# Altium PCB TYH-PD67W 2C1A 主板.pcbdoc (part 1 of 2)
Units mm, origin at the board's own origin, x right, y up, seen from the top; angles counter-clockwise.
Board outline 94.32 x 66.89 mm, 5 copper layers (Top Layer, Signal Layer 3, Signal Layer 1, Signal Layer 2, Bottom Layer), stack 0.941 mm thick; 52 components, 153 nets, 152 pads, 297 vias.
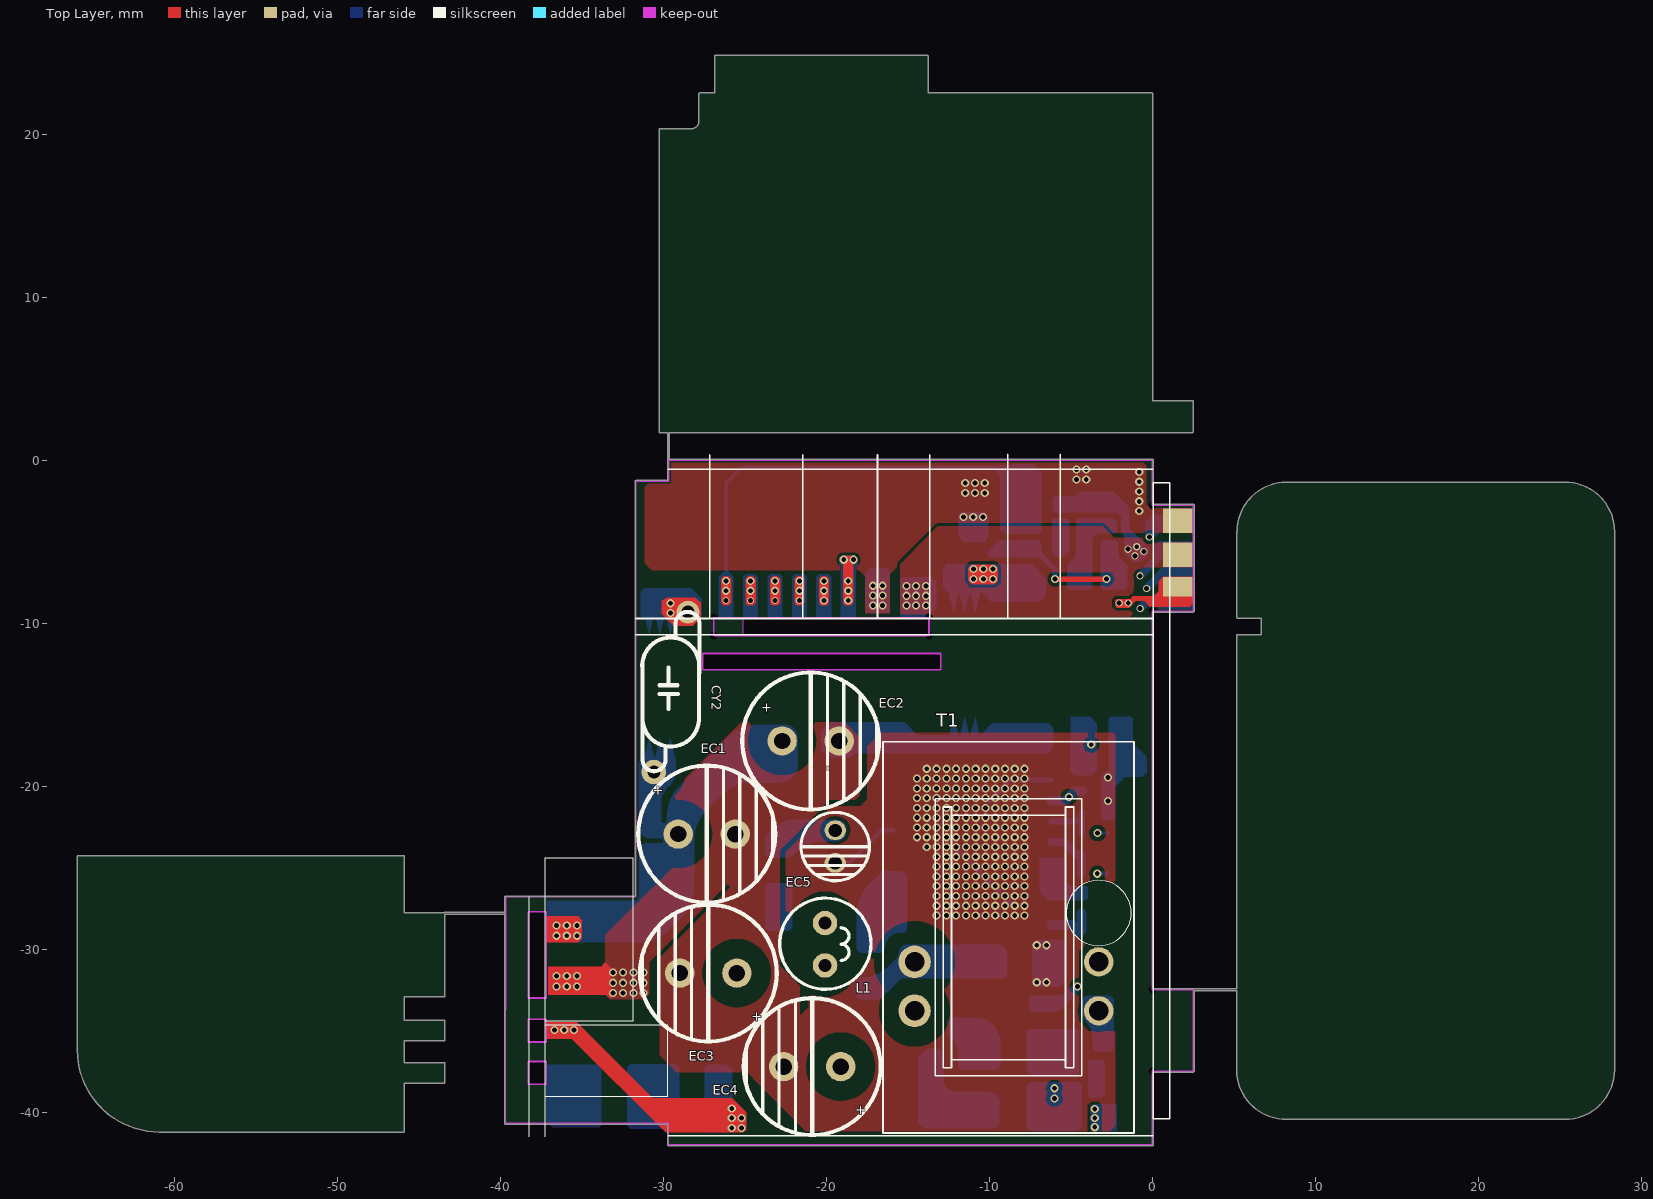
[diagram p0: Top Layer view]
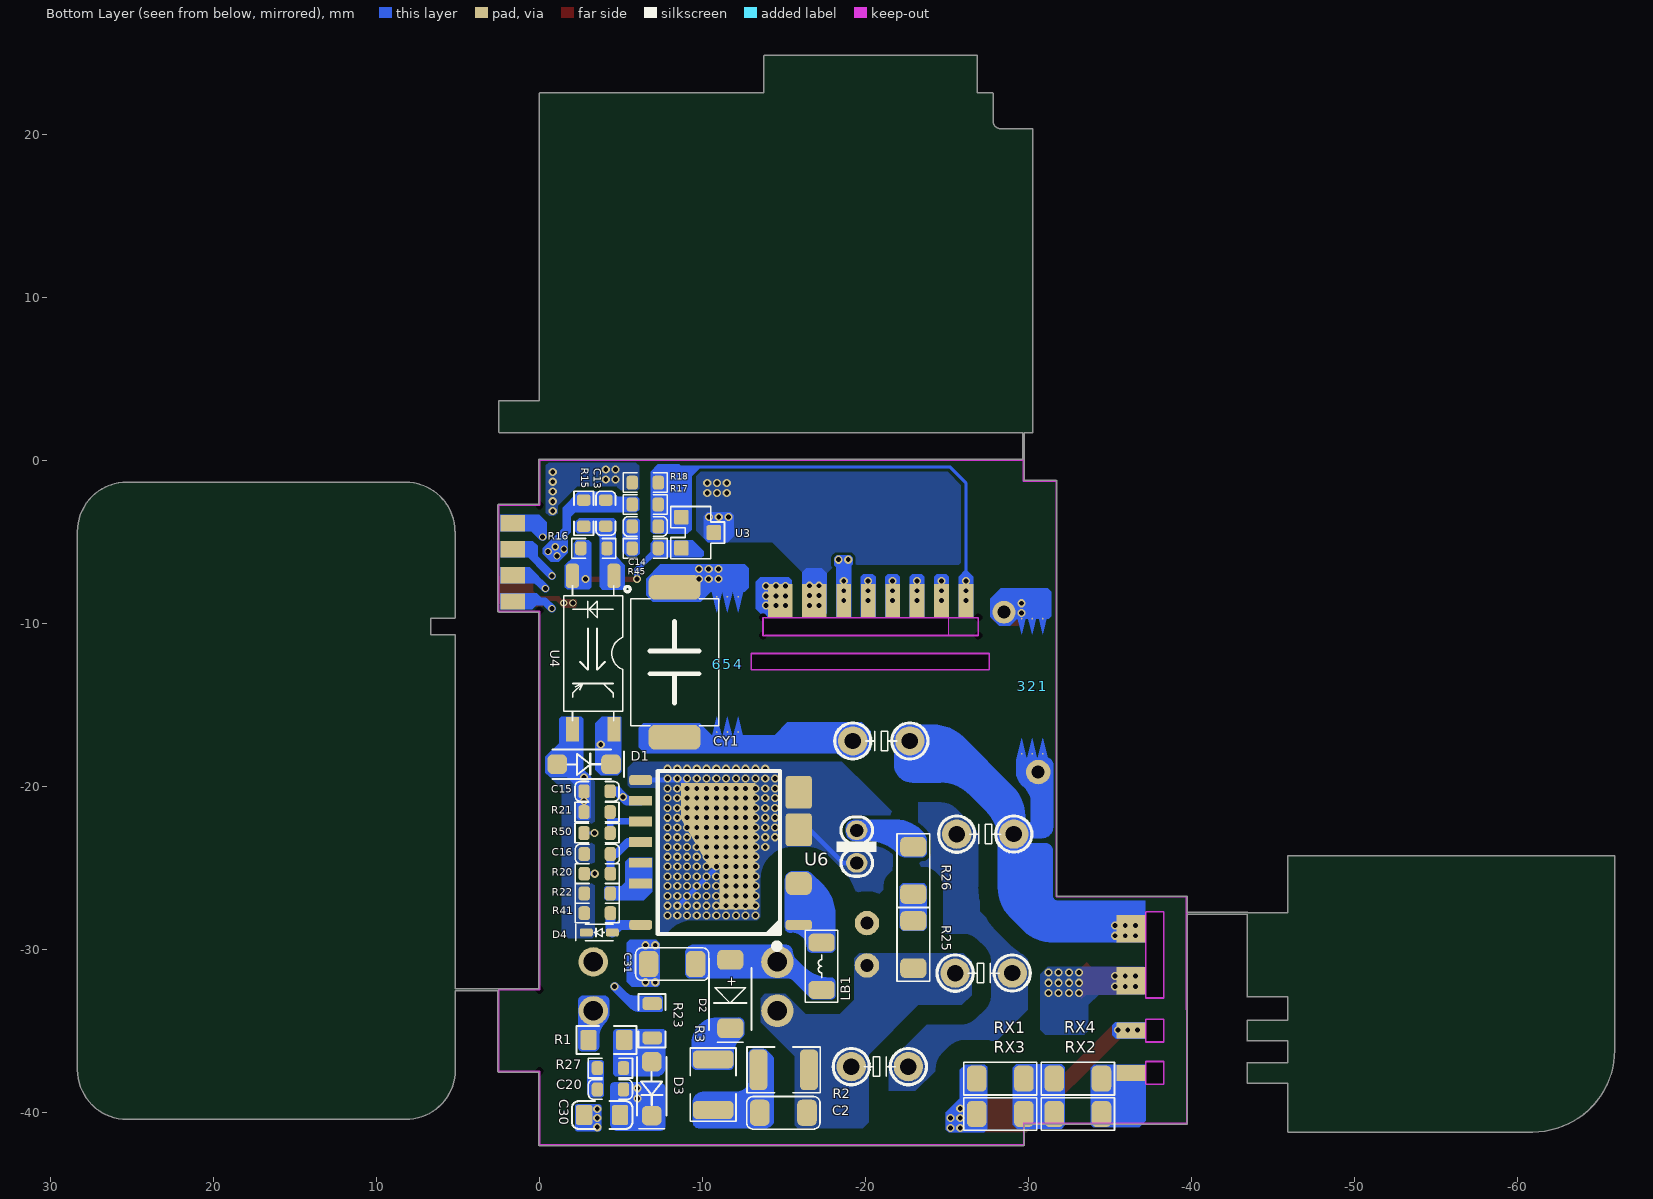
[diagram p1: Bottom Layer view, seen from below]
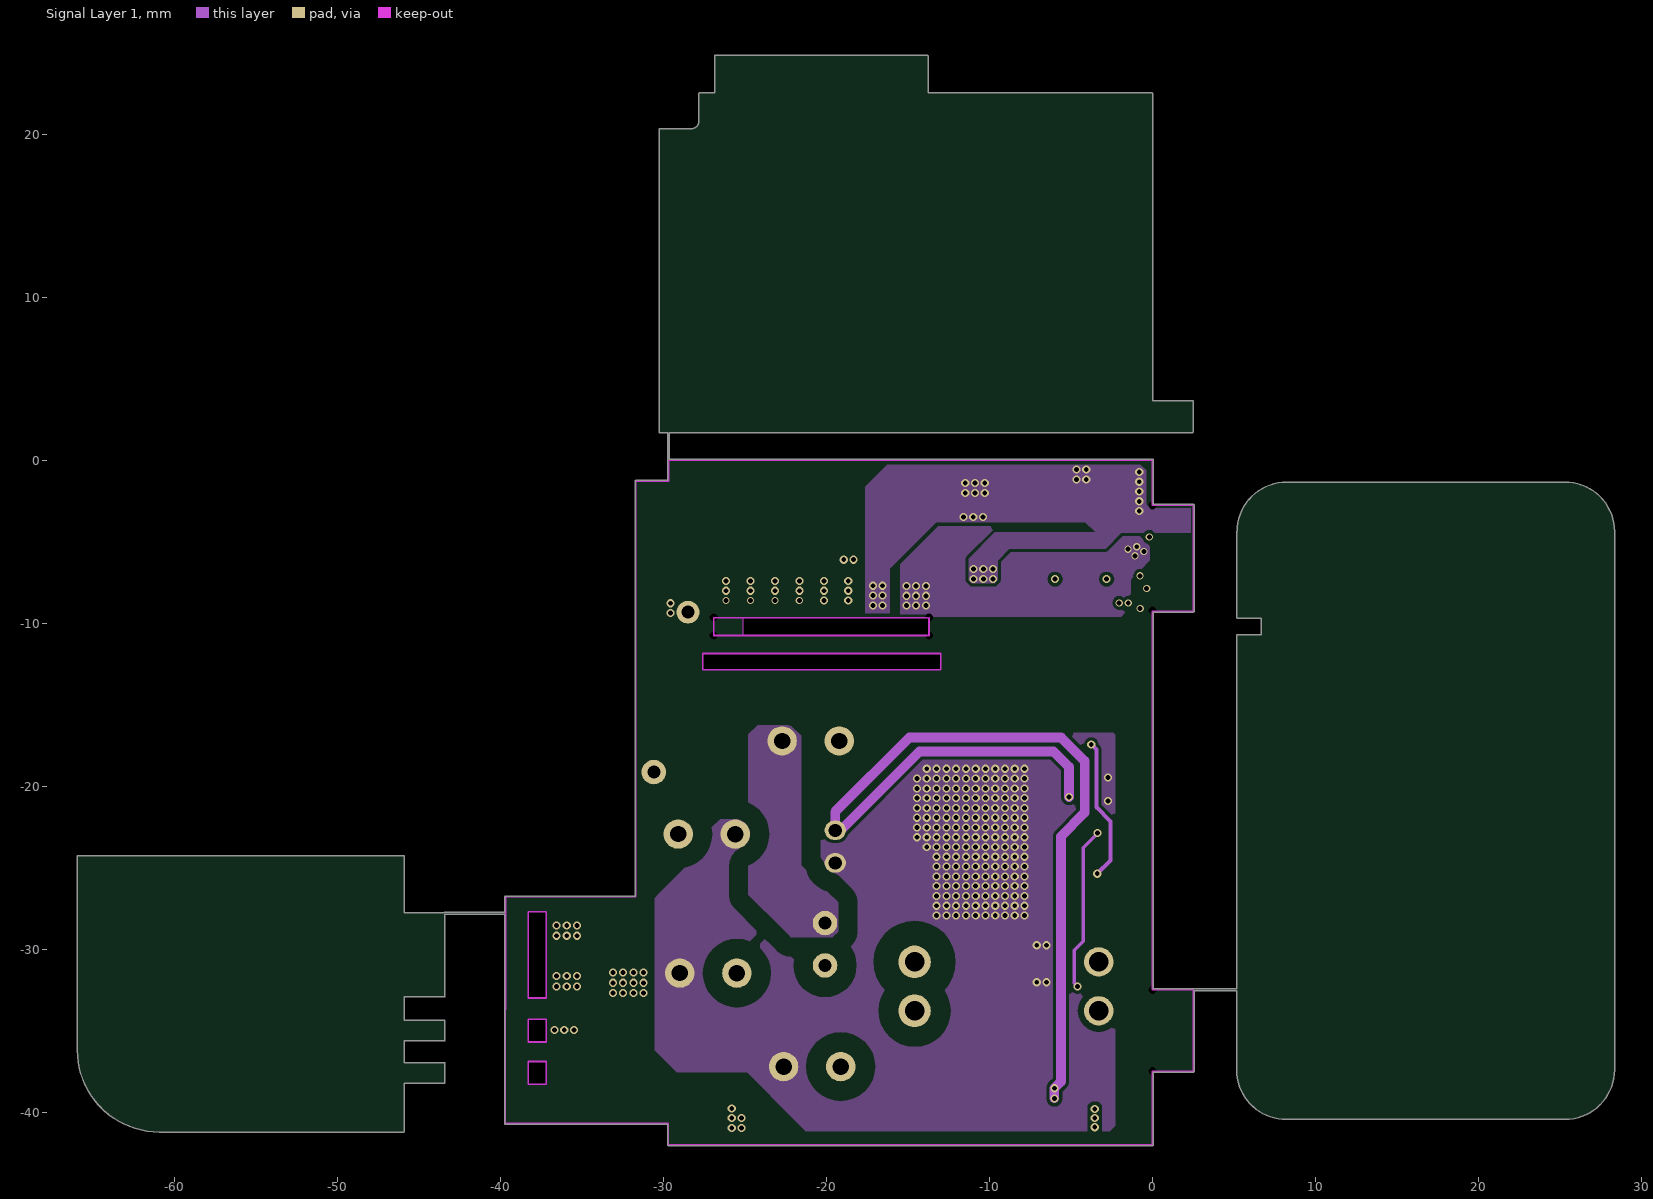
[diagram p2: Signal Layer 1]
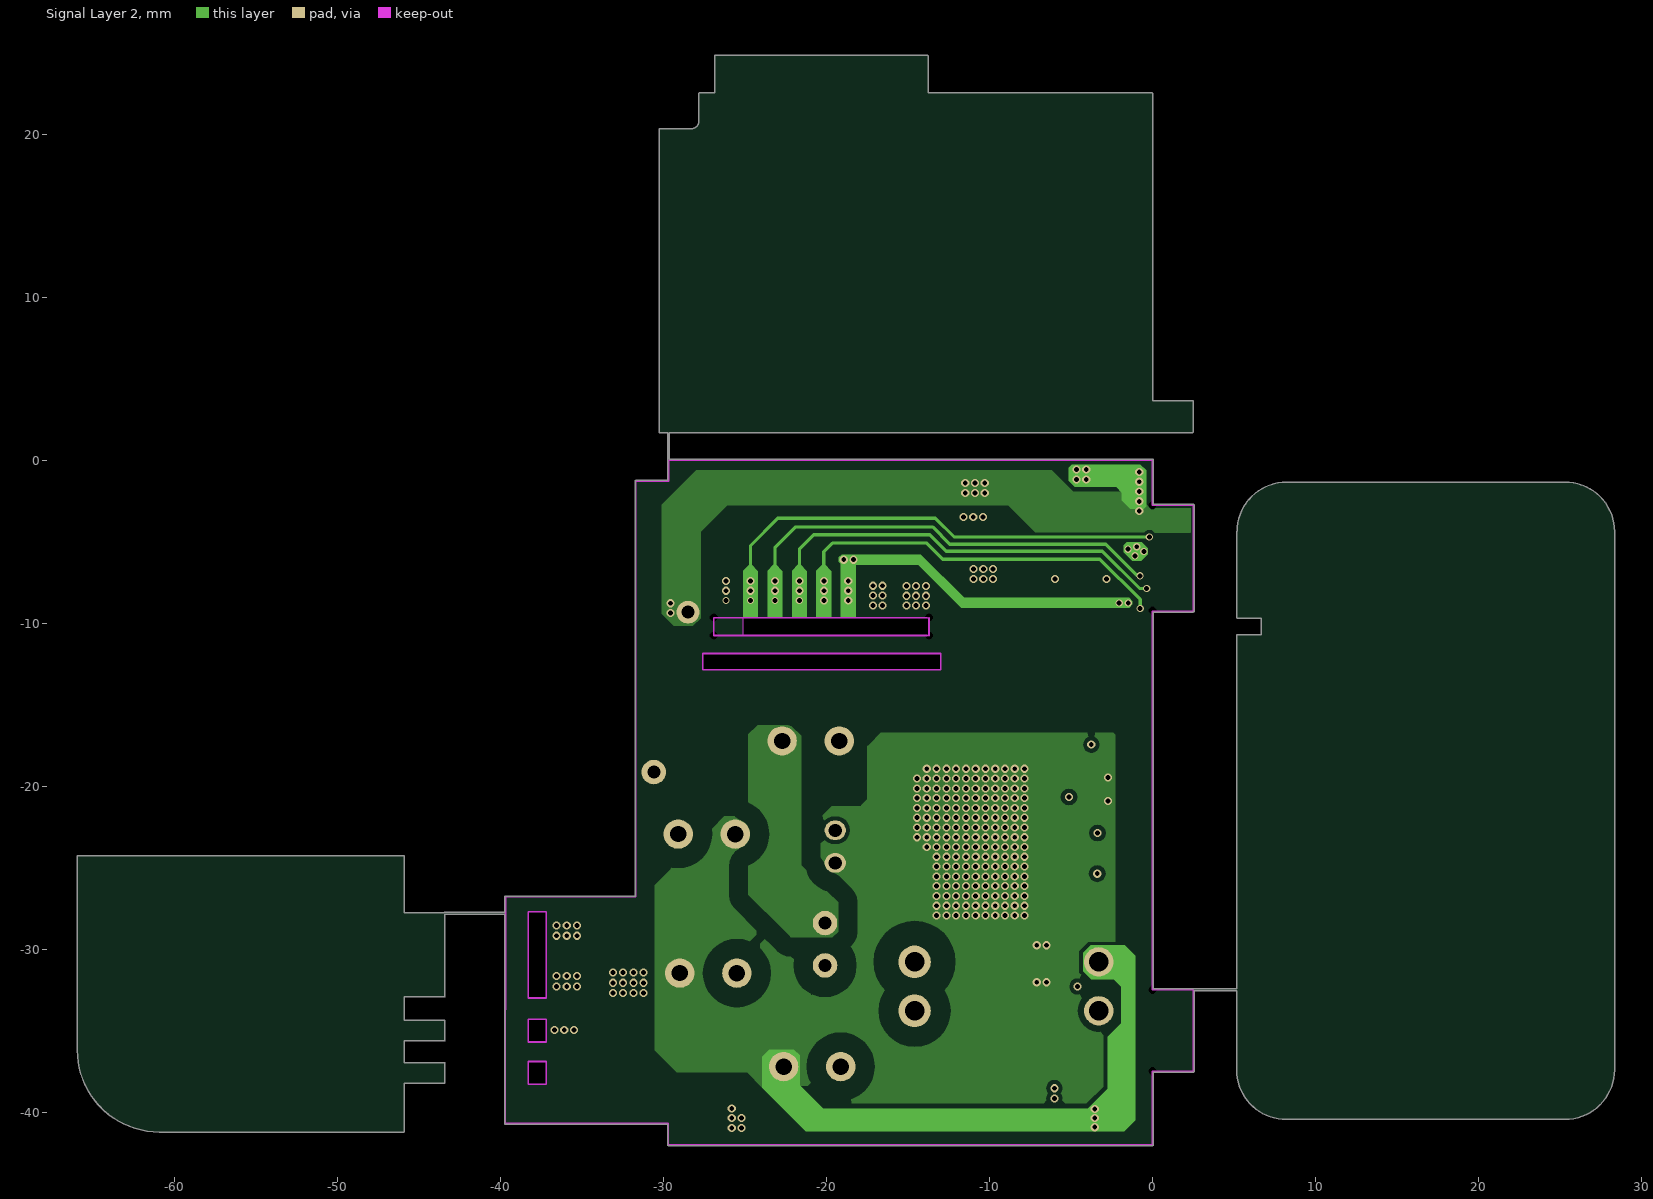
[diagram p3: Signal Layer 2]

## Layer stack, top to bottom
Top Solder: solder mask 0.0102, Solder Resist, Dk 3.5
Top Layer: signal copper 0.0356
Dielectric 1: core 0.254, FR-4, Dk 4.2
Signal Layer 3: signal copper 0.036
Dielectric 4: prepreg 0.127, Dk 4.2
Signal Layer 1: signal copper 0.036
Dielectric 2: core 0.254, Dk 4.2
Signal Layer 2: signal copper 0.036
Dielectric 3: prepreg 0.127, Dk 4.2
Bottom Layer: signal copper 0.0356
Bottom Solder: solder mask 0.0102, Solder Resist, Dk 3.5

## Board outline
-60.945,-41.225 -45.944,-41.225 ccw(c-45.944,-41.2) -45.919,-41.2 -45.919,-38.225 -43.445,-38.225 ccw(c-43.445,-38.2) -43.419,-38.2 -43.419,-37 ccw(c-43.445,-37) -43.445,-36.975 -45.919,-36.975 -45.919,-35.625 -43.445,-35.625 ccw(c-43.445,-35.6) -43.419,-35.6 -43.419,-34.4 ccw(c-43.445,-34.4) -43.445,-34.375 -45.919,-34.375 -45.919,-32.925 -43.445,-32.925 ccw(c-43.445,-32.9) -43.419,-32.9 -43.419,-27.85 -39.751,-27.85 -39.759,-40.693 ccw(c-39.709,-40.7) -39.709,-40.75 -29.759,-40.752 -29.76,-42.002 ccw(c-29.71,-42.002) -29.71,-42.052 0,-42.052 ccw(c0,-42.002) 0.05,-42.002 0.05,-37.55 2.5,-37.55 ccw(c2.5,-37.5) 2.55,-37.5 2.55,-32.55 5.163,-32.55 5.16,-37.409 ccw(c5.21,-37.409) 5.16,-37.409 ccw(c8.207,-37.409) 8.207,-40.456 ccw(c8.207,-40.406) 8.207,-40.456 ccw(c8.207,-40.406) 8.207,-40.456 25.296,-40.456 ccw(c25.296,-40.406) 25.308,-40.455 ccw(c25.296,-37.407) 28.344,-37.407 28.352,-4.393 ccw(c28.302,-4.393) 28.352,-4.393 ccw(c28.302,-4.393) 28.351,-4.381 ccw(c25.304,-4.393) 25.304,-1.346 8.229,-1.346 ccw(c8.229,-4.393) 5.181,-4.375 ccw(c5.228,-4.393) 5.178,-4.393 5.175,-9.653 ccw(c5.225,-9.653) 5.225,-9.703 6.674,-9.704 6.673,-10.703 5.225,-10.702 ccw(c5.225,-10.753) 5.174,-10.753 5.163,-32.45 0.05,-32.45 0.05,-9.32 2.5,-9.32 ccw(c2.5,-9.269) 2.55,-9.269 2.55,-2.769 ccw(c2.5,-2.769) 2.5,-2.719 0.05,-2.719 0.05,0 ccw(c0,0) 0,0.05 -29.65,0.05 -29.65,1.682 2.433,1.682 ccw(c2.433,1.733) 2.483,1.733 ccw(c2.433,1.733) 2.482,1.745 ccw(c2.45,1.784) 2.5,1.784 2.5,3.584 ccw(c2.45,3.584) 2.45,3.635 0,3.635 0,22.484 ccw(c-0.05,22.484) -0.014,22.52 ccw(c-0.05,22.484) -0.05,22.535 -13.768,22.535 -13.768,24.784 ccw(c-13.819,24.784) -13.819,24.835 -26.819,24.835 ccw(c-26.819,24.784) -26.869,24.784 -26.869,22.535 -27.789,22.535 ccw(c-27.789,22.484) -27.84,22.483 -27.84,20.784 cw(c-28.289,20.784) -28.289,20.335 cw(c-28.289,20.784) -28.289,20.335 cw(c-28.289,20.284) -28.289,20.335 -30.217,20.335 ccw(c-30.217,20.284) -30.268,20.284 -30.268,1.733 ccw(c-30.217,1.733) -30.217,1.682 -29.75,1.682 -29.75,-1.25 -31.7,-1.25 ccw(c-31.7,-1.3) -31.75,-1.3 -31.75,-26.75 -39.7,-26.75 ccw(c-39.7,-26.8) -39.75,-26.8 -39.751,-27.75 -43.445,-27.75 ccw(c-43.445,-27.8) -43.488,-27.775 -45.919,-27.775 -45.919,-24.3 ccw(c-45.945,-24.3) -45.945,-24.275 -65.945,-24.275 ccw(c-65.945,-24.3) -65.97,-24.3 -65.97,-36.2 ccw(c-60.945,-36.2)
cut-out: -25.119,-9.664 -13.719,-9.664 -13.719,-10.764 -25.119,-10.764
cut-out: -13,-11.862 -27.6,-11.862 -27.6,-12.862 -13,-12.862
cut-out: -38.3,-27.7 -37.2,-27.7 -37.2,-33 -38.3,-33
cut-out: -38.3,-34.3 -37.2,-34.3 -37.2,-35.7 -38.3,-35.7
cut-out: -38.3,-36.9 -37.2,-36.9 -37.2,-38.3 -38.3,-38.3

## Design rules (kind name [scope] priority, off if disabled: settings)
Clearance Clearance_19 [InNet('NetC4_2') vs InNet('PGND')] p1: gap=0.4
Clearance Clearance_18 [InNet('NetR15_1') vs InNet('PGND')] p2: gap=1
Clearance Clearance_17 [InNet('NetN_1') vs InNet('NetBD1_1')] p3: gap=1.55
Clearance Clearance_16 [InNet('NetN_1') vs InNet('PGND')] p4: gap=1.5
Clearance Clearance_15 [InNet('VIN') vs InNet('PGND')] p5 off: gap=5.8
Clearance Clearance_14 [InNet('CS') vs InNet('Bais-L')] p6: gap=0.45
Clearance Clearance_13 [InNet('SW') vs InNet('CS')] p7: gap=1.5
Clearance Clearance_12 [InNet('NetR15_1') vs InNet('CS')] p8: gap=1
Clearance Clearance_11 [InNet('NetBD1_3') vs InNet('CS')] p9: gap=1.1
Clearance Clearance_10 [InNet('HV') vs InNet('CS')] p10: gap=1.1
Clearance Clearance_9 [InNet('NetL2_1') vs InNet('CS')] p11: gap=1.5
Clearance Clearance_8 [InNet('NetC1_2') vs InNet('PGND')] p12: gap=1.2
Clearance Clearance_7 [InNet('NetBD1_3') vs InNet('PGND')] p13: gap=1.2
Clearance Clearance_6 [InNet('NetC2_2') vs InNet('PGND')] p14: gap=1.3
Clearance Clearance_5 [InNet('Bais-L') vs InNet('PGND')] p15: gap=0.45
Clearance Clearance_4 [InNet('SW') vs InNet('PGND')] p16: gap=1.5
Clearance Clearance_3 [InNet('HV') vs InNet('PGND')] p17: gap=1.2
Clearance Clearance_2 [InNet('NetL2_1') vs InNet('PGND')] p18: gap=1.5
Clearance Clearance_1 [OnLayer('Keep-Out Layer')] p19: gap=0.1
Clearance [All] p20: gap=0.2
PlaneConnect [All] p1: planeconnectstyle=Direct reliefexpansion=0.508 reliefentries=4 reliefconductorwidth=0.3 reliefairgap=0.254
PolygonConnect [All] p1: connectstyle=Direct reliefconductorwidth=0.3 reliefentries=4 polygonreliefangle="90 Angle" airgapwidth=0.3
RoutingVias [All] p1: holewidth=0.711 width=1.27 viastyle="Through Hole" minholewidth=0.711 minwidth=1.27 maxholewidth=0.711 maxwidth=1.27
SolderMaskExpansion [All] p1: expansion=0.05
Width [All] p1: maxlimit=10 minlimit=0.1 preferedwidth=0.2
28 further rules are at their usual default settings.

## Components (designator, comment, footprint, x,y, rotation, side; value= is the part's Value field where it differs from the comment)
1 "Comment" PET -30.881,-18.022 r180 top
2 "Comment" PET -30.231,-18.022 r180 top
3 "Comment" PET -29.581,-18.022 r180 top
4 "Comment" PET -12.187,-16.685 r180 top
5 "Comment" PET -11.537,-16.685 r180 top
6 "Comment" PET -10.887,-16.685 r180 top
C2 "1nF/1KV/1206" 1206CA -16.415,-40.045 r0 bottom (schematic designator C1)
C13 "33nF/25V/0402" 0603CX#1 -4.07,-3.254 r90 bottom (schematic designator C21)
C14 "0.1uF" 0603CX#2 -7.289,-4.068 r0 bottom
C15 "2.2uF/25V/0603" 0603CX#2 -4.335,-20.321 r0 bottom (schematic designator C7)
C16 "470pF/25V/0402" 0603CX#1 -3.554,-24.167 r0 bottom (schematic designator C5)
C20 "220PF/250V/0805" 0603CX#2 -3.556,-38.612 r180 bottom (schematic designator C4)
C30 "1nF/1KV/1206" 0805C -5.697,-41.031 r0 bottom (schematic designator C1)
C31 "47PF/1KV/1206" 1206CA -9.595,-30.922 r0 bottom (schematic designator C2)
CY1 "470pF/400V" Y1-SMT -8.294,-12.405 r270 bottom (schematic designator CY2)
CY2 "470pF/400V" Y1-N -30.601,-19.138 r270 top
D1 "ER07J/SOD-123" SOD-123A -4.392,-18.66 r0 bottom (schematic designator D3)
D2 "S2M" SMAF -11.707,-32.762 r270 bottom (schematic designator D1)
D3 "ER07J/SOD-123" SOD-123A -6.889,-40.217 r90 bottom
D4 "ER07J/SOD-123" SOD-523 -4.474,-28.986 r0 bottom (schematic designator D3)
EC1 "33uF/400V/10*20max" EC-8*18L -27.354,-22.945 r90 top (schematic designator EC3)
EC2 "33uF/400V/10*20max" EC-8*18L -20.975,-17.23 r90 top (schematic designator EC1)
EC3 "33uF/400V/10*20max" EC-8*18L -27.256,-31.475 r270 top
EC4 "33uF/400V/10*20max" EC-8*18L -20.881,-37.213 r270 top (schematic designator EC3)
EC5 "4.7uF/100V/5*11" EC-4*7L -19.468,-22.712 r0 top (schematic designator C6)
L1 "LGB0510  80uH" L-5*11 -20.095,-28.604 r270 top
LB1 "600R@100MHZ" 1206L -17.313,-29.602 r270 bottom (schematic designator L2)
R1 "2.2R/0805" 0805R -2.946,-35.577 r180 bottom (schematic designator R13)
R2 "300K/1206" 1210RS -16.535,-37.408 r0 bottom (schematic designator R1)
R3 "10R/0805" 1210RS -10.657,-39.87 r90 bottom (schematic designator R4)
R15 "1K/0402" 0603RX#1 -2.719,-3.254 r270 bottom (schematic designator R22)
R16 "1M/0402" 0603RX#1 -3.343,-5.412 r0 bottom (schematic designator R21)
R17 "100K" 0603RX#1 -6.49,-2.723 r180 bottom
R18 "95.3K" 0603RX#1 -6.49,-1.379 r180 bottom
R20 "51R/0402" 0603RX#1 -3.554,-25.374 r0 bottom (schematic designator R9)
R21 "18K/0402" 0603RX#1 -3.535,-21.596 r0 bottom (schematic designator R14)
R22 "220K/0805" 0603RX#2 -2.754,-26.588 r180 bottom (schematic designator R7)
R23 "220K/0805" 0805RX -6.915,-33.348 r270 bottom (schematic designator R7)
R25 "10K/1206" 1206RA -21.936,-31.92 r90 bottom (schematic designator R15)
R26 "10K/1206" 1206RA -21.936,-27.374 r90 bottom (schematic designator R15)
R27 "10R/0805" 0603RX#2 -5.156,-37.307 r0 bottom (schematic designator R10)
R41 "51R/0402" 0603RX#1 -3.554,-27.796 r180 bottom (schematic designator R9)
R45 "95.3K" 0603RX#1 -6.49,-5.412 r180 bottom
R50 "18K/0402" 0603RX#1 -3.535,-22.885 r0 bottom (schematic designator R14)
RX1 "2M 1206" 1206RA -30.473,-38.952 r0 bottom
RX2 "2M 1206" 1206RA -35.234,-41.117 r0 bottom
RX3 "2M 1206" 1206RA -30.473,-41.117 r0 bottom
RX4 "2M 1206" 1206RA -35.234,-38.952 r0 bottom
T1 "Comment" "ATQ2315P 4+4" -14.603,-24.788 r0 top
U3 "2N7002KL SOT-23" SOT-23_R -9.704,-4.446 r270 bottom (schematic designator Q8)
U4 "LTV-217-B" CT1018 -4.971,-6.357 r270 bottom
U6 "Comment" MK2789IAM/ESOP10(分) -14.76,-19.074 r180 bottom

## Footprints (in the part's own frame and the unit in brackets; to place one, negate y for a bottom-side part, rotate by r counter-clockwise, add the part's x,y. Pads: shape width x height; smd on the part's side, far side on the other; paste and mask are expansions set on the pad)
0603CX#1 [mm]
  rrect50% 0.7x0.85 smd: 1(-0.8,0) 2(0.8,0)
  silkscreen extent -1.35,-0.6 1.35,0.6, body extent -0.8,-0.41 0.8,0.41, height 0.81
0603CX#2 [mm]
  rrect50% 0.7x0.85 smd: 1(0,0) 2(1.6,0)
  silkscreen extent -0.55,-0.6 2.15,0.6, body extent 0,-0.41 1.6,0.41, height 0.81
0603RX#1 [mm]
  rrect50% 0.7x0.85 smd: 1(-0.8,0) 2(0.8,0)
  silkscreen extent -1.35,-0.6 1.35,0.6, body extent -0.77,-0.42 0.78,0.43, height 0.45
0603RX#2 [mm]
  rrect50% 0.7x0.85 smd: 1(0,0) 2(1.6,0)
  silkscreen extent -0.55,-0.6 2.15,0.6, body extent 0.03,-0.42 1.58,0.43, height 0.45
0805C [mm]
  rrect20% 1x1.2 smd: 1(0.75,-0.85) 2(2.95,-0.85)
  silkscreen extent 0,-1.7 3.7,0, body extent 0.85,-1.46 2.85,-0.24, height 0.51
0805R [mm]
  rrect20% 1x1.2 smd: 1(0.066,-0.001) 2(2.266,-0.001)
  silkscreen extent -0.68,-0.85 3.02,0.85, body extent 0.17,-0.63 2.17,0.62, height 0.45
0805RX [mm]
  rrect50% 0.8x1.2 smd: 1(0,0) 2(2.1,0)
  silkscreen extent -0.6,-0.83 2.7,0.83, body extent 0.05,-0.61 2.05,0.61, height 0.51
1206CA [mm]
  rrect50% 1.2x1.6 smd mask+0.03: 1(0,0) 2(2.9,0)
  silkscreen extent -0.8,-1 3.7,1, body extent -0.15,-0.81 3.05,0.81, height 1.21
1206L [mm]
  rrect50% 1.1x1.6 smd mask+0.03: 1(0,0) 2(2.9,0)
  silkscreen extent -0.75,-1 3.65,1, body extent -0.15,-0.8 3.05,0.8, height 1
1206RA [mm]
  rrect50% 1.2x1.6 smd mask+0.03: 1(3.65,-1) 2(0.75,-1)
  silkscreen extent -0.05,-2 4.45,0, body extent 0.6,-1.8 3.8,-0.2, height 0.55
1210RS [mm]
  rrect50% 1.1x2.5 smd mask+0.03: 1(3.1,0) 2(0,0)
  silkscreen extent -0.7,-1.4 3.8,1.4, body extent -0.05,-1.25 3.15,1.25, height 0.55
"ATQ2315P 4+4" [mm]
  round 2 on Top Overlay mask+0.04: 1(0,0) 2(0,-3) 7(11.3,-3) 8(11.3,0)
  round 2 hole 1.2 mask+0.04: 3(0,-6) 4(0,-9)
  round 1.8 hole 1.2 mask+0.04: 5(11.3,-9) 6(11.3,-6)
  silkscreen extent -1.94,-16.5 13.46,7.5, body extent -1.79,-16.02 13.31,7.08, height 19.06
CT1018 [mm]
  rrect50% 1.5x0.8 smd: 1(0.75,-0.4) 2(0.75,-2.94)
  rect 1.5x0.8 smd: 3(10.15,-2.941) 4(10.15,-0.4)
  silkscreen extent 1.36,-3.47 9.64,0.59, body extent 0.38,-3.47 10.58,0.13, height 2.3
EC-4*7L [mm]
  oval 1.3x1.2 hole 0.8: 1(0,0) 2(0,-2)
  silkscreen extent -2.1,-3.1 2.1,1.1, body extent -2.01,-3.04 1.99,0.98, height 8.04
EC-8*18L [mm]
  round 1.8 hole 1: 1(0,1.749) 2(-0.002,-1.751)
  silkscreen extent -4.2,-4.2 4.2,4.2, body extent -4,-4 4,4, height 18
L-5*11 [mm]
  round 1.5 hole 0.8: 1(-0.2,0) 2(2.4,0)
  silkscreen extent -1.73,-2.77 3.87,2.82, body extent -1.56,-2.61 3.71,2.64, height 11.5
MK2789IAM/ESOP10(分) [mm]
  rrect50% 1.6x0.6 smd: 1(1.15,-9.445)
  rrect50% 1.6x1.4 smd: 2(1.15,-6.905)
  rrect20% 1.6x2 smd: 3(1.15,-3.615) 4(1.15,-1.315)
  rrect50% 1.4x0.6 smd: 5(-8.55,-0.555) 11(-8.55,-9.445)
  rect 1.4x0.6 smd: 7(-8.55,-3.095) 8(-8.55,-4.365) 9(-8.55,-5.635) 10(-8.55,-6.905) EM(-8.55,-1.825)
  rect 2.6x2.165 smd: 12(-4.775,-1.833)
  rect 3.55x2.6 smd rot 120: 12(-4.062,-3.802)
  rect 2.2x7.755 smd: 12(-2.6,-4.627)
  silkscreen extent -7.5,-10.89 0.05,0, body extent -8.91,-10 1.41,0, height 1.85
PET [mm]
  round 0.1 smd far side: 1(0,0) 2(0,-8.3)
  Bottom Layer region: 0.325,0.35 -0.325,0.35 0,-0.95
  Bottom Layer region: 0.35,-8.75 -0.35,-8.75 0,-7.35
SMAF [mm]
  rrect50% 1.2x1.6 smd: 1(-2.1,0) 2(2.1,0)
  silkscreen extent -2.2,-1.3 2.95,1.3, body extent -2.35,-1.25 2.35,1.25, height 1
SOD-123A [mm]
  rrect50% 1.2x1.2 smd: 1(3.3,0) 2(0,0)
  silkscreen extent -0.8,-0.9 3.6,0.9, body extent -0.19,-0.8 3.51,0.8, height 1.22
SOD-523 [mm]
  rrect50% 0.8x0.5 smd: 1(0,0) 2(1.6,0)
  silkscreen extent -0.05,-0.5 2.24,0.5, body extent 0,-0.4 1.6,0.4, height 0.65
SOT-23_R [mm]
  rrect20% 0.9x0.9 smd: 1(-0.95,-1) 2(0.95,-1) 3(0,1)
  silkscreen extent -1.6,-1.65 1.6,1.65, body extent -1.46,-1.44 1.44,1.36, height 1.2
Y1-N [mm]
  round 1.5 hole 0.8: 1(0,0)
  round 1.4 hole 0.8: 2(-9.806,2.096)
  silkscreen extent -9.83,-0.7 -0.05,2.8, body extent -10.14,-1.57 0.34,3.66, height 8.2
Y1-SMT [mm]
  rrect50% 1.5x3.2 smd: 1(-4.6,0) 2(4.6,0)
  silkscreen extent -3.9,-2.7 3.9,2.7, body extent -5,-2.7 5,2.7, height 2.5

## Part data
C2 C15 C16 C20 C30 C31: library part CAP
C13: library part Cap, "Capacitor"
CY1 CY2: library part Cap
D1 D3 D4: library part DIODE
D2: library part Diode_fast, "High Conductance Fast Diode"
EC1 EC2 EC3 EC4 EC5: library part CAPACITOR, "C?"
L1: library part L-1
LB1 R1 R2 R3 R15 R16 R20 R21 R22 R23 R25 R26 R27 R41 R50 RX1 RX2 RX3 RX4: library part Res1, "Resistor"
U3: library part NMOS
U4: library part PC817, "Optocoupler，PC817X2YIPW，4pin SOP"

## Free pads (board coordinates)
  rect 1.8x1 smd far side: 0(-36.3,-37.6)
  rrect20% 1.8x1 smd far side: 0(-36.3,-35)
  rect 1.8x1.7 smd far side: 0(-36.3,-31.95) 0(-36.3,-28.75)
  rect 1.5x2 smd far side: 0(-16.869,-8.614) 1(-14.769,-8.614)
  round 0.2 hole 0.5: 0(0,-9.235) 1(0,-2.769) 2(0,-32.5) 3(0,-37.5) 4(-26.919,-9.664) 5(-13.719,-9.664) 6(-13.719,-10.764) 7(-26.919,-10.764)
  rect 0.9x2 smd far side: 2(-26.169,-8.614) 2(-24.669,-8.614) 2(-23.169,-8.614) 2(-21.669,-8.614) 2(-20.169,-8.614) 2(-18.669,-8.614)
  rect 1.8x1.2 smd: 3(1.55,-7.769)
  rect 1.8x1.5 smd: 3(1.55,-5.819) 3(1.55,-3.719)
  rect 1.5x1 smd far side: 3(1.65,-8.669) 3(1.65,-7.069) 3(1.65,-5.469) 3(1.65,-3.869)

## Via types
v1: diameter 0.5, hole 0.3, Top Layer to Bottom Layer, tented both sides, 283 vias
v2: diameter 0.45, hole 0.3, Top Layer to Bottom Layer, tented both sides, 14 vias

## Nets (pads, with @x,y where several pads share a name; then routed paths per layer and width w, separated by ;. In a path a pad name is that pad's centre, name@x,y a point inside that pad or via, vN(x,y) a via of type N, cw(c..) or ccw(c..) an arc to the next point about the centre after c; other vN are vias at no path point)
3.3V: 
A: C14.2 R45.1
A+: 
A-: 
Bais-L: D3.1 R1.2 R23.2 R27.1
BOOT0: 
CC1: 
CC2: 
CPA: 
CS: 
D: 
D+: 
D-: 
DM: 
DP: 
EM: D4.1 R41.2 U6.11 | length 3.2
  Bottom Layer w0.6: U6.11@-6.21,-28.519 -4.941,-28.519 D4.1@-4.474,-28.986 -4.354,-28.866 R41.2@-4.354,-27.796
EN: 
EN_IC: 
FB: C16.1 R20.1 U6.8 | length 3.4
  Bottom Layer w0.5: U6.8@-6.21,-23.439 -5.431,-23.439 -4.703,-24.167 C16.1@-4.354,-24.167 R20.1@-4.354,-25.374
G-SR: 
GND-C: 
HV: C2.1 EC3.1 EC4.1 L1.2 R2.2 R25.2 T1.4
ISET: R22.2 U6.9 U6.10 | length 3.4
  Bottom Layer w0.5: U6.9@-6.21,-24.709 U6.10@-6.21,-25.979 -5.601,-26.588 R22.2@-4.354,-26.588
KEY: 
KEY1: 
LEDA: 
M: R23.1 R50.2 | length 13.4
  Signal Layer 1 w0.2: v1(-4.611,-32.3) -4.802,-32.11 -4.802,-30.063 -4.258,-29.519 -4.258,-23.77 v1(-3.373,-22.885)
  Bottom Layer w0.2: R23.1@-6.915,-33.348 -5.659,-33.348 v1(-4.611,-32.3) ; v1@-3.359,-22.885 R50.2@-2.735,-22.885
N: 
NetBD1_1: pad.0@-36.3,-35 RX1.1 RX3.1
  other v1: -25.816,-40.973 -25.216,-40.973 -25.816,-40.373 -25.216,-40.373 -25.816,-39.773 -36.698,-34.973 -36.098,-34.973 -35.498,-34.973
NetBD1_3: 1.1 2.1 3.1 CY2.1 EC1.1 EC2.1 L1.1 pad.0@-36.3,-28.75 | length 20.4
  Bottom Layer w0.2: pad.0@-36.3,-28.75 -33.007,-28.75 ccw(c-33.007,-26.21) -31.211,-28.006 -29.847,-26.642 ccw(c-31.643,-24.846) -29.103,-24.846 EC1.1@-29.103,-22.945 -29.103,-22.738 cw(c-26.563,-22.738) -28.359,-20.942 -25.391,-17.973 cw(c-23.595,-19.769) -23.595,-17.229 EC2.1@-22.724,-17.229
  other v1: -36.57,-29.186 -35.942,-29.186 -35.314,-29.186 -36.57,-28.558 -35.942,-28.558 -35.314,-28.558
NetBD2_1: 
NetC1_2: C2.2 R2.1 R3.2
NetC2_2: D2.2 R3.1
NetC3_2: 
NetC4_1: C20.1 R27.2
NetC4_2: R1.1 T1.5
NetC6_1: C15.1 C20.2 C30.1 D3.2 EC5.1 R26.1 U6.EM | length 65.3
  Signal Layer 1 w0.6: v1(-6.025,-39.158) v1(-6.025,-38.537) -5.622,-38.134 -5.622,-23.086 -4.165,-21.629 -4.165,-18.458 -5.605,-17.017 -14.917,-17.017 -19.468,-21.569 EC5.1@-19.468,-22.712 -19.138,-22.712 -14.303,-17.877 -6.069,-17.877 -5.129,-18.817 v1(-5.129,-20.666)
  Bottom Layer w0.6: R26.1@-22.936,-23.724 R26.1@-22.663,-23.451 ; R26.1@-22.882,-23.782 -21.812,-22.712 EC5.1@-19.468,-22.712 ; U6.EM@-6.21,-20.899 -5.362,-20.899 v1(-5.129,-20.666) -4.784,-20.321 C15.1@-4.335,-20.321
NetC10_2: 
NetC21_1: C13.1 R15.2 R16.1 U4.1
NetC22_1: 
NetC24_1: 
NetC25_2: 
NetC26_2: 
NetC30_2: 
NetC31_2: 
NetC100_2: 
NetC101_1: 
NetC101_2: 
NetC112_1: 
NetD4_K: D1.2 R20.2 U4.4 | length 11.9
  Signal Layer 1 w0.25: v1(-3.758,-17.456) -3.447,-17.767 -3.447,-21.296 -2.575,-22.169 -2.575,-24.556 v1(-3.393,-25.374)
  Bottom Layer w0.25: D1.2@-4.392,-18.66 D1.2@-4.282,-18.77 ; D1.2@-4.36,-18.848 -4.099,-18.587 -4.099,-16.551 ; v1(-3.393,-25.374) R20.2@-2.754,-25.374
NetF1_1: 
NetF1_2: 
NetKEY1_1: 
NetL2_1: LB1.1 U6.1 U6.2
NetLF1_2: 
NetN_1: pad.0@-36.3,-37.6 RX2.2 RX4.2
NetNTC2_1: 
NetQ1_3: 
NetQ3_4: 
NetR15_1: R25.1 R26.2
NetR25_2: 
NetR29_1: 
NetR31_2: 
NetR32_2: 
NetR41_2: 
NetR42_2: 
NetR134_1: 
NetRX1_2: 
NetRX3_2: RX1.2 RX2.1 RX3.2 RX4.1
NetU1_26: 
NetU1_27: 
NetU1_28: 
NetU1_29: 
NetU1_30: 
NetU1_32: 
NewNet1: 
NewNet2: 
NewNet3: 
NewNet4: 
NewNet5: 
NewNet6: 
NewNet7: 
NewNet8: 
NewNet9: 
NewNet10: 
NewNet11: 
NewNet12: 
NewNet13: 
NewNet14: 
NewNet15: 
NewNet16: 
NewNet18: 
NewNet22: 
NewNet23: 
NewNet24: 
NewNet25: 
NewNet28: 
NewNet32: 
NewNet33: C14.1 pad.2@-26.169,-8.614 R17.2 R18.2 U3.1 | length 30
  Bottom Layer w0.2: v1(-26.169,-7.414) -26.169,-1.402 -25.186,-0.419 -8.25,-0.419 R18.2@-7.29,-1.379 C14.1@-7.29,-4.068 -8.132,-4.068 U3.1@-8.704,-3.496
  other v1: -26.169,-8.014
  other v2: -26.169,-8.614
NewNet34: 
NewNet36: 
NewNet38: 
NewNet40: 
NewNet41: 
NewNet42: 
OPTO: R16.2 R45.2 U3.2 U4.2 | length 5.6
  Top Layer w0.35: v1(-5.982,-7.304) v1(-2.824,-7.304)
  Bottom Layer w0.35: R45.2@-7.29,-5.412 -5.982,-6.72 v1(-5.982,-7.304)
OTP: 
PA2: 
PA4: 
PA5: 
PA6: 
PA7: 
PA8: 
PA9: 
PB0: 
PB1: 
PF0: 
PF1: 
PF3: 
PGND: 4.1 5.1 6.1 C15.2 C16.2 C30.2 C31.2 CY1.2 D1.1 D4.2 EC1.2 EC2.2 EC3.2 EC4.2 EC5.2 pad.0@-36.3,-31.95 R21.2 R22.1 R41.1 T1.6 U4.3 U6.3 U6.4 U6.5 U6.12 | length 32.9
  Signal Layer 2 w0.3: v1(-3.546,-40.928) -2.771,-40.928 -1.451,-39.608 -1.451,-31.626 -2.29,-30.787 T1.6@-3.303,-30.787
  Bottom Layer w0.3: EC5.2@-19.468,-24.712 -18.609,-24.712 -16.585,-22.689 U6.3@-15.91,-22.689 ; U6.12@-12.16,-23.702 v1@-8.642,-27.22 ; U6.12@-9.985,-20.907 -8.707,-19.629 U6.5@-6.21,-19.629 ; R21.2@-2.735,-21.596 v1(-2.735,-19.465) -1.93,-18.66 D1.1@-1.092,-18.66 -1.559,-18.194 -1.559,-16.551
  other v1: -3.546,-40.364 -3.546,-39.81 -33.11,-32.698 -32.483,-32.698 -31.855,-32.698 -31.227,-32.698 -36.57,-32.287 -35.942,-32.287 -35.314,-32.287 -33.11,-32.07 -32.483,-32.07 -31.855,-32.07 -31.227,-32.07 -7.104,-32.039 -6.504,-32.039 -36.57,-31.659 -35.942,-31.659 -35.314,-31.659 -33.11,-31.442 -32.483,-31.442 -31.855,-31.442 -31.227,-31.442 -7.104,-29.766 -6.504,-29.766 -13.252,-27.939 -12.652,-27.939 -12.052,-27.939 -11.452,-27.939 -10.852,-27.939 -10.252,-27.939 -9.652,-27.939 -9.052,-27.939 -8.452,-27.939 -7.852,-27.939 -13.252,-27.339 -12.652,-27.339 -12.052,-27.339 -11.452,-27.339 -10.852,-27.339 -10.252,-27.339 -9.652,-27.339 -9.052,-27.339 -8.452,-27.339 -7.852,-27.339 -13.252,-26.739 -12.652,-26.739 -12.052,-26.739 -11.452,-26.739 -10.852,-26.739 -10.252,-26.739 -9.652,-26.739 -9.052,-26.739 -8.452,-26.739 -7.852,-26.739 -13.252,-26.139 -12.652,-26.139 -12.052,-26.139 -11.452,-26.139 -10.852,-26.139 -10.252,-26.139 -9.652,-26.139 -9.052,-26.139 -8.452,-26.139 -7.852,-26.139 -13.252,-25.539 -12.652,-25.539 -12.052,-25.539 -11.452,-25.539 -10.852,-25.539 -10.252,-25.539 -9.652,-25.539 -9.052,-25.539 -8.452,-25.539 -7.852,-25.539 -13.252,-24.939 -12.652,-24.939 -12.052,-24.939 -11.452,-24.939 -10.852,-24.939 -10.252,-24.939 -9.652,-24.939 -9.052,-24.939 -8.452,-24.939 -7.852,-24.939 -13.252,-24.339 -12.652,-24.339 -12.052,-24.339 -11.452,-24.339 -10.852,-24.339 -10.252,-24.339 -9.652,-24.339 -9.052,-24.339 -8.452,-24.339 -7.852,-24.339 -13.852,-23.739 -13.252,-23.739 -12.652,-23.739 -12.052,-23.739 -11.452,-23.739 -10.852,-23.739 -10.252,-23.739 -9.652,-23.739 -9.052,-23.739 -8.452,-23.739 -7.852,-23.739 -14.452,-23.139 -13.852,-23.139 -13.252,-23.139 -12.652,-23.139 -12.052,-23.139 -11.452,-23.139 -10.852,-23.139 -10.252,-23.139 -9.652,-23.139 -9.052,-23.139 -8.452,-23.139 -7.852,-23.139 -14.452,-22.539 -13.852,-22.539 -13.252,-22.539 -12.652,-22.539 -12.052,-22.539 -11.452,-22.539 -10.852,-22.539 -10.252,-22.539 -9.652,-22.539 -9.052,-22.539 -8.452,-22.539 -7.852,-22.539 -14.452,-21.939 -13.852,-21.939 -13.252,-21.939 -12.652,-21.939 -12.052,-21.939 -11.452,-21.939 -10.852,-21.939 -10.252,-21.939 -9.652,-21.939 -9.052,-21.939 -8.452,-21.939 -7.852,-21.939 -14.452,-21.339 -13.852,-21.339 -13.252,-21.339 -12.652,-21.339 -12.052,-21.339 -11.452,-21.339 -10.852,-21.339 -10.252,-21.339 -9.652,-21.339 -9.052,-21.339 -8.452,-21.339 -7.852,-21.339 -2.741,-20.925 -14.452,-20.739 -13.852,-20.739 -13.252,-20.739 -12.652,-20.739 -12.052,-20.739 -11.452,-20.739 -10.852,-20.739 -10.252,-20.739 -9.652,-20.739 -9.052,-20.739 -8.452,-20.739 -7.852,-20.739 -14.452,-20.139 -13.852,-20.139 -13.252,-20.139 -12.652,-20.139 -12.052,-20.139 -11.452,-20.139 -10.852,-20.139 -10.252,-20.139 -9.652,-20.139 -9.052,-20.139 -8.452,-20.139 -7.852,-20.139 -14.452,-19.539 -13.852,-19.539 -13.252,-19.539 -12.652,-19.539 -12.052,-19.539 -11.452,-19.539 -10.852,-19.539 -10.252,-19.539 -9.652,-19.539 -9.052,-19.539 -8.452,-19.539 -7.852,-19.539 -13.852,-18.939 -13.252,-18.939 -12.652,-18.939 -12.052,-18.939 -11.452,-18.939 -10.852,-18.939 -10.252,-18.939 -9.652,-18.939 -9.052,-18.939 -8.452,-18.939 -7.852,-18.939
RS: 
RST: 
SCL: pad.2@-24.669,-8.614 pad.3@1.65,-3.869 | length 30
  Signal Layer 2 w0.2: v1(-24.669,-7.414) -24.669,-5.243 -22.992,-3.566 -13.321,-3.566 -12.169,-4.718 v2(-0.199,-4.718)
  Bottom Layer w0.5: v2(-0.199,-4.718) 0.65,-3.869 pad.3@1.65,-3.869
  other v1: -24.669,-8.014
  other v2: -24.669,-8.614
SCL1: 
SDA: pad.2@-23.169,-8.614 pad.3@1.65,-5.469 | length 29.3
  Signal Layer 2 w0.2: v1(-23.169,-7.414) -23.169,-5.382 -21.885,-4.098 -13.496,-4.098 -12.436,-5.158 -2.87,-5.158 -0.927,-7.101 v2(-0.768,-7.101)
  Bottom Layer w0.5: v2(-0.768,-7.101) 0.864,-5.469 pad.3@1.65,-5.469
  other v1: -23.169,-8.014
  other v2: -23.169,-8.614
SDA1: 
SET: 
SGND: 1.2 2.2 3.2 4.2 5.2 6.2 CY1.1 CY2.2 pad.0@-16.869,-8.614 pad.1@0,-2.769 pad.3@1.55,-3.719 R18.1 U3.3
  other v1: -29.578,-9.383 -17.161,-8.91 -16.561,-8.91 -29.578,-8.783 -17.161,-8.31 -16.561,-8.31 -17.161,-7.71 -16.561,-7.71 -10.984,-7.286 -10.384,-7.286 -9.784,-7.286 -10.984,-6.686 -10.384,-6.686 -9.784,-6.686 -11.602,-3.5 -11.002,-3.5 -10.402,-3.5 -0.819,-3.128 -0.819,-2.528 -11.495,-2.014 -10.895,-2.014 -10.295,-2.014 -0.819,-1.928 -11.495,-1.414 -10.895,-1.414 -10.295,-1.414 -0.819,-1.328 -4.67,-1.179 -4.07,-1.179 -0.819,-0.728 -4.67,-0.579 -4.07,-0.579
SRCG_A: 
SW: C31.1 D2.1 LB1.2 T1.3
SW-SR: 
SWCLK: pad.2@-21.669,-8.614 pad.3@1.65,-7.069 | length 27.3
  Signal Layer 2 w0.2: v1(-21.669,-7.414) -21.669,-5.46 -20.795,-4.586 -13.678,-4.586 -12.666,-5.598 -3.075,-5.598 -0.796,-7.878 v2(-0.362,-7.878)
  Bottom Layer w0.5: v2(-0.362,-7.878) 0.446,-7.069 pad.3@1.65,-7.069
  other v1: -21.669,-8.014
  other v2: -21.669,-8.614
SWCLK1: 
SWCLK2: 
SWDIO: pad.2@-20.169,-8.614 pad.3@1.65,-8.669 | length 26
  Signal Layer 2 w0.2: v1(-20.169,-7.414) -20.169,-5.614 -19.642,-5.088 -13.862,-5.088 -12.873,-6.077 -3.229,-6.077 -0.76,-8.546 v2(-0.76,-9.104)
  Bottom Layer w0.5: v2(-0.76,-9.104) -0.326,-8.669 pad.3@1.65,-8.669
  other v1: -20.169,-8.614 -20.169,-8.014
SWDIO1: 
SWDIO2: 
SWRST: 
TXD: 
U2-2: 
V3V3: 
VBUS: 
VC: 
VDD: 
VDD1: 
VDS: 
VFB: 
VFB1: 
VIN: C13.2 pad.1@-14.769,-8.614 pad.3@1.55,-5.819 pad.5 R15.1 R17.1
  other v1: -15.105,-8.926 -14.505,-8.926 -13.905,-8.926 -15.105,-8.326 -14.505,-8.326 -13.905,-8.326 -15.105,-7.726 -14.505,-7.726 -13.905,-7.726
  other v2: -1.081,-5.873 -0.533,-5.611 -1.511,-5.46 -0.972,-5.317
VMS: R21.1 R50.1 U6.7 | length 3.7
  Bottom Layer w0.4: U6.7@-6.21,-22.169 -4.335,-22.169 R21.1@-4.335,-21.596 R50.1@-4.335,-22.885
VOUT1: pad.0@0,-9.235 pad.2@-18.669,-8.614 pad.3@1.55,-7.769 | length 18.8
  Top Layer w0.2: pad.3@1.081,-8.238 pad.3@1.55,-7.769 pad.3@1.376,-7.596
  Top Layer w0.5: v1(-18.948,-6.11) v1(-18.348,-6.11)
  Signal Layer 2 w0.2: v1@-18.348,-6.087 -14.319,-6.087 -11.596,-8.81 v2@-2.19,-8.81
  other v1: -18.669,-8.614 -18.669,-8.014 -18.669,-7.414
  other v2: -2.05,-8.764 -1.491,-8.764
VXO: 
XGND: 
pads on no net: T1.1 T1.2 T1.7 T1.8

## Polygon pours and split planes (outlines as drawn)
SGND on Bottom Layer "Bottom Layer-No Net" (solid, remove dead copper, pour order 80): -0.879,-3.418 -0.597,-3.418 -0.402,-3.222 -0.402,-2.701 -0.402,-0.328 -0.567,-0.162 -5.915,-0.162 -6.11,-0.357 -6.11,-1.767 -6.014,-1.863 -4.983,-1.863 -4.777,-1.656 -4.728,-1.607 -3.873,-1.607 -2.308,-1.607 -1.59,-2.325 -1.109,-2.806 -1.109,-3.02 -1.109,-3.273 -0.984,-3.397
PGND on Bottom Layer "Bottom Layer-No Net" (solid, remove dead copper, pour order 74): -21.67,-24.931 -21.67,-21.606 -20.291,-20.227 -18.556,-18.492 -17.05,-18.492 -5.791,-18.492 -5.412,-18.871 -5.412,-19.956 -5.571,-20.116 -7.061,-20.116 -7.346,-20.4 -7.346,-28.35 -7.346,-28.895 -7.578,-29.127 -8.072,-29.621 -8.805,-29.621 -16.742,-29.621 -18.088,-28.275 -19.769,-26.594 -20.846,-26.594 -21.653,-25.787 -21.653,-25.003
PGND on Bottom Layer "Bottom Layer-No Net" (solid, remove dead copper, pour order 71): -3.175,-29.331 -1.752,-29.331 -1.354,-28.932 -1.354,-20.155 -0.63,-19.431 -1.108,-18.952 -1.823,-18.952 -2.668,-18.952 -3.112,-19.397 -3.146,-19.43 -3.407,-19.691 -3.407,-28.623 -3.407,-28.925 -3.407,-29.216 -3.291,-29.332
PGND on Bottom Layer "Bottom Layer-No Net" (solid, remove dead copper, pour order 104): -23.237,-19.614 -23.237,-33.44 -20.206,-36.47 -20.206,-38.288 -20.624,-38.706 -23.062,-38.706 -26.145,-35.623 -28.051,-35.623 -29.958,-33.716 -29.958,-30.638 -27.004,-27.684 -27.004,-21.174 -25.381,-19.551 -23.386,-19.551
PGND on Bottom Layer "Bottom Layer-No Net" (solid, remove dead copper, pour order 81): -37.216,-32.792 -34.307,-32.792 -33.686,-33.413 -33.686,-34.994 -33.433,-35.247 -31.038,-35.247 -30.737,-34.946 -30.737,-31.53 -31.187,-31.08 -37.177,-31.08 -37.218,-31.121
HV on Bottom Layer "Bottom Layer-No Net" (solid, remove dead copper, pour order 97): -19.613,-30.257 -26.011,-30.257 -26.513,-30.759 -26.513,-32.833 -25.924,-33.423 -23.254,-33.423 -20.206,-36.47 -20.206,-40.63 -19.837,-41 -15.846,-41 -15.653,-40.806 -15.653,-36.564 -13.573,-34.483 -13.573,-33.015 -13.837,-32.751 -15.091,-32.751 -16.325,-33.985 -18.427,-33.985 -19.316,-33.095 -19.316,-30.554
SGND on Bottom Layer "Bottom Layer-No Net" (solid, remove dead copper, pour order 112): -17.63,-6.933 -18.129,-6.434 -18.368,-6.434 -25.739,-6.434 -25.937,-6.236 -25.937,-1.514 -25.007,-0.584 -10.042,-0.584 -9.621,-1.005 -9.621,-4.325 -10.205,-4.909 -10.34,-5.043 -11.553,-5.043 -14.287,-5.043 -16.12,-6.876 -16.12,-9.405 -17.63,-9.405
SGND on Top Layer "Bottom Layer-No Net" (solid, remove dead copper, pour order 78): 2.338,-4.47 -13.574,-4.47 -15.485,-6.382 -16.12,-7.017 -16.12,-9.405 -17.63,-9.405 -17.63,-7.121 -17.984,-6.767 -30.729,-6.767 -31.163,-6.333 -31.163,-1.66 -31.012,-1.509 -30.802,-1.3 -29.7,-1.3 -29.7,0 -0.73,0 -0.429,-0.3 -0.402,-0.328 -0.402,-0.634 -0.402,-2.701 -0.151,-2.952 2.338,-2.952
VIN on Top Layer "Bottom Layer-No Net" (solid, remove dead copper, pour order 73): -13.16,-4.057 -15.485,-6.382 -15.485,-8.104 -15.485,-9.371 -15.427,-9.429 -15.236,-9.62 -13.524,-9.62 -1.385,-9.62 -1.207,-9.443 -1.148,-9.383 -1.148,-7.298 -1.148,-7.131 -0.684,-6.668 -0.596,-6.58 2.338,-6.58 2.338,-5.073 -0.022,-5.073 -0.1,-4.994 -0.335,-4.759 -0.676,-4.759 -2.371,-4.759 -3.074,-4.057 -13.16,-4.057
PGND on Top Layer "Bottom Layer-No Net" (solid, remove dead copper, pour order 82): -30.885,-32.045 -30.885,-30.814 -21.863,-21.792 -21.856,-21.792 -17.96,-17.896 -17.96,-17.028 -18.891,-16.097 -25.25,-16.097 -29.659,-20.506 -29.659,-25.214 -33.567,-29.123 -33.567,-32.774 -33.249,-33.092 -31.202,-33.092 -30.886,-32.777
PGND on Top Layer "Bottom Layer-No Net" (solid, remove dead copper, pour order 100): -23.142,-39.312 -21.269,-41.185 -2.634,-41.185 -2.281,-40.832 -2.281,-16.863 -2.409,-16.735 -13.548,-16.735 -16.675,-16.735 -17.389,-17.449 -17.497,-17.557 -17.497,-17.744 -17.497,-20.744 -17.497,-20.818 -17.858,-21.178 -17.91,-21.23 -18.693,-21.23 -19.677,-21.23 -20.246,-21.799 -22.502,-24.055 -22.502,-24.547 -22.502,-30.634 -21.101,-32.036 -21.101,-33.57 -21.388,-33.857 -23.747,-36.216 -23.747,-37.903 -23.747,-38.708 -23.142,-39.312
PGND on Top Layer "Bottom Layer-No Net" (solid, remove dead copper, pour order 95): -25.912,-26.179 -25.912,-26.222 -27.805,-28.115 -30.232,-30.542 -30.232,-31.377 -30.232,-34.3 -30.232,-36.526 -29.727,-37.031 -29.186,-37.573 -26.96,-37.573 -24.882,-37.573 -23.142,-39.312 -22.556,-38.727 -21.657,-38.727 -21.657,-32.247 -22.882,-31.022 -22.882,-30.667 -22.882,-23.782
PGND on Top Layer "Bottom Layer-No Net" (solid, remove dead copper, pour order 93): -17.96,-17.896 -17.96,-20.547 -18.251,-20.838 -19.797,-20.838 -21.355,-22.396 -24.317,-25.358 -24.565,-25.358 -24.565,-20.791 -24.435,-20.661 -20.494,-16.719 -19.207,-16.719 -18.268,-16.719 -17.96,-17.028 -17.96,-17.641
PGND on Top Layer "Bottom Layer-No Net" (solid, remove dead copper, pour order 88): -27.108,-24.983 -25.912,-26.179 -25.912,-26.984 -25.912,-31.13 -26.658,-31.876 -27.564,-31.876 -28.404,-32.715 -28.404,-36.129 -26.96,-37.573 -24.882,-37.573 -24.07,-38.384 -23.142,-39.312 -22.456,-39.312 -22.242,-39.312 -21.657,-38.727 -21.657,-32.93 -21.657,-32.247 -22.549,-31.354 -22.882,-31.022 -22.882,-29.627 -22.882,-28.451 -22.882,-22.741 -23.862,-21.76 -23.957,-21.665 -25.934,-21.665 -27.169,-22.901 -27.169,-24.421
SGND on Signal Layer 1 "Bottom Layer-No Net" (solid, remove dead copper, pour order 85): -11.284,-7.361 -11.077,-7.568 -9.712,-7.568 -9.495,-7.351 -9.495,-6.158 -8.78,-5.444 -2.899,-5.444 -1.926,-4.47 2.338,-4.47 2.338,-2.952 -0.151,-2.952 -0.402,-2.701 -0.402,-0.634 -0.761,-0.274 -16.266,-0.274 -17.63,-1.638 -17.63,-9.405 -16.12,-9.405 -16.12,-6.65 -13.268,-3.798 -4.121,-3.798 -3.478,-4.441 -9.668,-4.441 -11.284,-6.056
VIN on Signal Layer 1 "Bottom Layer-No Net" (solid, remove dead copper, pour order 91): -13.16,-4.057 -15.485,-6.382 -15.485,-9.606 -1.921,-9.606 -1.353,-9.037 -1.353,-7.336 -0.159,-6.143 -0.159,-5.31 -0.164,-5.286 -1.394,-4.057
PGND on Signal Layer 1 "Bottom Layer-No Net" (solid, remove dead copper, pour order 101): -27.033,-22.533 -27.033,-23.356 -28.691,-25.014 -30.232,-26.556 -30.549,-26.872 -30.549,-31.129 -30.549,-36.209 -29.186,-37.573 -24.882,-37.573 -21.269,-41.185 -21.269,-34.553 -20.844,-34.128 -20.883,-34.089 -20.883,-32.795 -20.883,-30.577 -24.794,-26.666 -24.446,-26.318 -24.446,-23.14 -24.446,-22.485 -24.904,-22.026 -26.526,-22.026 -27.033,-22.533
PGND on Signal Layer 1 "Bottom Layer-No Net" (solid, remove dead copper, pour order 99): -23.142,-39.312 -21.269,-41.185 -2.634,-41.185 -2.281,-40.832 -2.281,-16.863 -2.409,-16.735 -13.548,-16.735 -16.675,-16.735 -17.389,-17.449 -17.497,-17.557 -17.497,-17.744 -17.497,-20.744 -17.497,-20.818 -17.858,-21.178 -17.91,-21.23 -18.693,-21.23 -19.677,-21.23 -20.246,-21.799 -22.502,-24.055 -22.502,-24.547 -22.502,-30.634 -21.101,-32.036 -21.101,-33.57 -21.388,-33.857 -23.747,-36.216 -23.747,-37.903 -23.747,-38.708 -23.142,-39.312
NetBD1_3 on Signal Layer 1 "Bottom Layer-No Net" (solid, remove dead copper, pour order 92): -22.349,-16.256 -24.232,-16.256 -24.794,-16.818 -24.794,-26.666 -22.671,-28.789 -22.263,-29.197 -22.187,-29.273 -19.931,-29.273 -19.644,-29.273 -19.298,-28.927 -19.298,-27.136 -20.033,-26.401 -21.567,-24.867 -21.567,-24.45 -21.567,-16.924 -22.155,-16.336
SGND on Signal Layer 2 "Bottom Layer-No Net" (solid, remove dead copper, pour order 94): 2.338,-2.952 -0.151,-2.952 -1.149,-1.954 -4.855,-1.954 -6.184,-0.625 -27.986,-0.625 -30.109,-2.748 -30.109,-9.429 -29.366,-10.172 -28.199,-10.172 -27.735,-9.709 -27.735,-4.39 -26.103,-2.758 -8.852,-2.758 -7.14,-4.47 2.308,-4.47 2.338,-4.441
PGND on Signal Layer 2 "Bottom Layer-No Net" (solid, remove dead copper, pour order 102): -20.979,-38.214 -20.979,-30.481 -24.794,-26.666 -24.794,-23.948 -24.517,-23.671 -24.517,-22.443 -24.565,-22.396 -25.108,-21.853 -25.805,-21.853 -26.275,-21.853 -27.026,-22.605 -27.074,-22.605 -29.659,-25.189 -30.549,-26.08 -30.549,-26.872 -30.549,-36.209 -29.186,-37.573 -24.882,-37.573 -23.942,-38.512
PGND on Signal Layer 2 "Bottom Layer-No Net" (solid, remove dead copper, pour order 98): -23.142,-39.312 -21.269,-41.185 -2.634,-41.185 -2.281,-40.832 -2.281,-16.863 -2.409,-16.735 -13.548,-16.735 -16.675,-16.735 -17.389,-17.449 -17.497,-17.557 -17.497,-17.744 -17.497,-20.744 -17.497,-20.818 -17.858,-21.178 -17.91,-21.23 -18.693,-21.23 -19.677,-21.23 -20.246,-21.799 -22.502,-24.055 -22.502,-24.547 -22.502,-30.634 -21.101,-32.036 -21.101,-33.57 -21.388,-33.857 -23.747,-36.216 -23.747,-37.903 -23.747,-38.708 -23.142,-39.312
NetBD1_3 on Signal Layer 2 "Bottom Layer-No Net" (solid, remove dead copper, pour order 89): -22.349,-16.256 -24.232,-16.256 -24.794,-16.818 -24.794,-26.666 -22.671,-28.789 -22.263,-29.197 -22.187,-29.273 -19.931,-29.273 -19.644,-29.273 -19.298,-28.927 -19.298,-27.136 -20.033,-26.401 -21.567,-24.867 -21.567,-24.45 -21.567,-16.924 -22.155,-16.336

## Keep-outs
Keep-Out Layer:
  lines w0.1: -13.819,-10.764 -26.919,-10.764 -26.919,-9.664 -13.819,-9.664 ; -13.719,-10.764 -13.719,-9.664 ; -39.709,-40.7 -29.709,-40.702 -29.71,-42.002 0,-42.002 0,-37.5 2.5,-37.5 2.5,-32.5 0,-32.5 0,-9.269 2.5,-9.269 2.5,-2.769 0,-2.769 0,0 -29.7,0 -29.7,-1.3 -31.7,-1.3 -31.7,-26.8 -39.7,-26.8 -39.709,-40.7 ; -38.3,-38.3 -37.2,-38.3 -37.2,-36.9 -38.3,-36.9 -38.3,-38.3 ; -38.3,-35.7 -37.2,-35.7 -37.2,-34.3 -38.3,-34.3 -38.3,-35.7 ; -38.3,-33 -37.2,-33 -37.2,-27.7 -38.3,-27.7 -38.3,-33 ; -27.6,-12.862 -13,-12.862 -13,-11.862 -27.6,-11.862 -27.6,-12.862

## Other copper
Top Layer:
  region net VOUT1: -18.808,-7.128 -18.52,-7.128 -18.356,-7.292 -18.356,-8.746 -18.5,-8.89 -18.854,-8.89 -18.964,-8.781 -18.964,-7.284
  region net VOUT1: -2.215,-8.525 -1.374,-8.525 -1.212,-8.364 0.075,-8.364 0.393,-8.046 0.393,-7.417 0.647,-7.163 2.45,-7.163 2.455,-7.169 2.455,-8.364 2.458,-8.366 2.458,-8.807 2.273,-8.992 -0.166,-8.992 -0.515,-8.643 -1.022,-8.643 -1.425,-9.046 -2.183,-9.046 -2.302,-8.927 -2.302,-8.612
  region net NetBD1_3: -37.168,-29.596 -35.239,-29.596 -35.012,-29.369 -35.012,-28.218 -35.249,-27.981 -37.168,-27.981
  region net PGND: -37.065,-32.792 -33.55,-32.792 -33.249,-33.092 -33.249,-31.132 -33.567,-30.814 -33.834,-31.08 -37.065,-31.08
  region net SGND: -29.751,-8.445 -28.046,-8.445 -27.735,-8.756 -27.735,-9.709 -28.199,-10.172 -29.366,-10.172 -30.109,-9.429 -30.109,-8.672 -29.942,-8.505
  region net SGND: -11.12,-6.424 -9.688,-6.424 -9.513,-6.598 -9.513,-7.43 -9.686,-7.603 -11.093,-7.603 -11.302,-7.394 -11.302,-6.605
  region net NetBD1_1: -24.922,-41.077 -24.922,-40.009 -25.782,-39.15 -30.673,-39.15 -35.342,-34.481 -37.171,-34.481 -37.191,-34.501 -37.191,-35.477 -37.171,-35.497 -35.626,-35.497 -29.87,-41.253 -25.098,-41.253
  pour cut-out: -4.522,-31.444 -4.522,-34.43 -3.922,-35.03 -2.412,-35.03 -1.935,-34.553 -1.935,-32.301 -2.792,-31.444
  region net NewNet33: -26.308,-7.128 -26.02,-7.128 -25.856,-7.292 -25.856,-8.746 -26,-8.89 -26.354,-8.89 -26.464,-8.781 -26.464,-7.284
  region net SCL: -24.808,-7.128 -24.52,-7.128 -24.356,-7.292 -24.356,-8.746 -24.5,-8.89 -24.854,-8.89 -24.964,-8.781 -24.964,-7.284
  region net SDA: -23.308,-7.128 -23.02,-7.128 -22.856,-7.292 -22.856,-8.746 -23,-8.89 -23.354,-8.89 -23.464,-8.781 -23.464,-7.284
  region net SWCLK: -21.808,-7.128 -21.52,-7.128 -21.356,-7.292 -21.356,-8.746 -21.5,-8.89 -21.854,-8.89 -21.964,-8.781 -21.964,-7.284
  region net SWDIO: -20.308,-7.128 -20.02,-7.128 -19.856,-7.292 -19.856,-8.746 -20,-8.89 -20.354,-8.89 -20.464,-8.781 -20.464,-7.284
  region net VOUT1: -18.964,-8.781 -18.964,-6.238 -18.686,-5.961 -18.356,-6.291 -18.356,-8.746 -18.5,-8.89 -18.854,-8.89
  pour cut-out: -1.303,-27.787 ccw(c-3.305,-27.787) -3.305,-25.785 -3.306,-25.785 ccw(c-3.306,-27.778) -5.299,-27.778 ccw(c-3.29,-27.778) -3.29,-29.787 ccw(c-3.29,-27.8) -1.303,-27.8
  pour cut-out: -17.273,-29.422 ccw(c-19.813,-29.422) -19.813,-26.882 -20.335,-26.882 ccw(c-20.335,-29.422) -22.875,-29.422 -22.875,-29.938 ccw(c-20.335,-29.938) -20.335,-32.478 -19.813,-32.478 ccw(c-19.813,-29.938) -17.273,-29.938
Signal Layer 1:
  pour cut-out: -24.77,-29.592 -24.068,-28.89 -23.583,-28.89 -23.583,-29.182 -24.445,-30.045
Signal Layer 2:
  region net VIN: -1.592,-5.046 -0.656,-5.046 -0.292,-5.409 -0.292,-5.78 -0.69,-6.177 -1.24,-6.177 -1.755,-5.662 -1.755,-5.208
  region net VOUT1: -19.242,-6.226 -19.242,-5.966 -19.069,-5.793 -14.211,-5.793 -11.549,-8.454 -1.44,-8.454 -1.235,-8.659 -1.235,-8.856 -1.425,-9.046 -11.731,-9.046 -14.364,-6.413 -19.055,-6.413
  region net SGND: -4.95,-0.283 -0.752,-0.283 -0.402,-0.634 -0.402,-2.833 -0.553,-2.984 -1.362,-2.984 -1.892,-2.454 -1.892,-1.99 -2.243,-1.639 -4.769,-1.639 -5.14,-1.267 -5.14,-0.473
  pour cut-out: -24.77,-29.592 -24.068,-28.89 -23.583,-28.89 -23.583,-29.182 -24.445,-30.045
  pour cut-out: -4.491,-30.101 -3.934,-29.545 -1.603,-29.545 -0.813,-30.335 -0.813,-40.701 -1.556,-41.444 -21.444,-41.444 -23.942,-38.946 -23.942,-38.512 -21.784,-38.512 -21.657,-38.384 -21.149,-38.384 -20.071,-39.462 -4.065,-39.462 -3.035,-38.433 -3.035,-35.274 -2.174,-34.413 -2.174,-32.434 -2.503,-32.106 -3.859,-32.106 -4.491,-31.475
  region net PGND: -21.269,-41.185 -23.942,-38.512 -23.942,-36.607 -23.503,-36.167 -22.016,-36.167 -21.657,-36.526 -21.657,-38.356 -20.218,-39.795 -3.973,-39.795 -3.18,-39.001 -2.598,-39.001 -2.376,-39.224 -2.376,-40.587 -2.973,-41.185
  region net PGND: -3.799,-29.78 -1.698,-29.78 -1.055,-30.423 -1.055,-40.511 -1.736,-41.192 -3.695,-41.192 -3.81,-41.077 -3.81,-39.631 -2.761,-38.582 -2.761,-35.379 -1.935,-34.553 -1.935,-32.301 -2.388,-31.848 -3.751,-31.848 -4.238,-31.362 -4.238,-30.219
  region net SCL: -25.12,-9.616 -25.12,-6.79 -24.728,-6.398 -24.626,-6.398 -24.216,-6.807 -24.216,-9.616
  region net SDA: -23.62,-9.616 -23.62,-6.79 -23.228,-6.398 -23.126,-6.398 -22.716,-6.807 -22.716,-9.616
  region net SWCLK: -22.12,-9.616 -22.12,-6.79 -21.728,-6.398 -21.626,-6.398 -21.216,-6.807 -21.216,-9.616
  region net SWDIO: -20.62,-9.616 -20.62,-6.79 -20.228,-6.398 -20.126,-6.398 -19.716,-6.807 -19.716,-9.616
  region net VOUT1: -19.12,-9.616 -19.12,-6.263 -18.216,-6.263 -18.216,-9.616
Bottom Layer:
  region net VIN: -15.293,-7.177 -13.551,-7.177 -13.272,-7.457 -13.272,-9.111 -13.764,-9.603 -15.485,-9.603 -15.485,-7.37
  region net VIN: -0.694,-6.231 -0.204,-5.742 -0.204,-5.403 -1.174,-4.433 -1.56,-4.433 -1.748,-4.621 -1.748,-5.669 -1.185,-6.231
  region net OPTO: -3.034,-4.926 -2.255,-4.926 -2.093,-5.087 -2.093,-5.928 -1.564,-6.458 -1.564,-7.797 -1.696,-7.93 -3.048,-7.93 -3.171,-7.807 -3.171,-5.063
  region net VOUT1: -19.125,-9.608 -19.125,-6.468 -19.215,-6.377 -19.215,-5.995 -19.07,-5.85 -18.23,-5.85 -18.086,-5.994 -18.086,-6.442 -18.223,-6.58 -18.223,-9.608
  region net NetC21_1: -5.079,-7.949 -3.865,-7.949 -3.696,-7.78 -3.696,-4.736 -3.452,-4.492 -2.328,-4.492 -2.211,-4.375 -2.211,-3.786 -2.432,-3.565 -4.558,-3.565 -4.673,-3.68 -4.673,-5.868 -5.246,-6.441 -5.246,-7.782
  region net VIN: -6.001,-2.26 -4.817,-2.26 -4.511,-1.954 -2.392,-1.954 -1.437,-2.909 -1.437,-4.17 -1.174,-4.433 -1.174,-5.987 -1.302,-6.115 -1.748,-5.669 -1.748,-4.621 -1.933,-4.436 -1.933,-3.471 -2.195,-3.209 -5.948,-3.209 -6.11,-3.047 -6.11,-2.369
  region net SGND: -17.63,-9.405 -17.63,-6.933 -17.323,-6.626 -16.358,-6.626 -16.114,-6.87 -16.12,-6.876 -16.12,-9.405
  region net PGND: -3.013,-22.074 -2.424,-22.074 -2.291,-21.94 -2.291,-20.039 -1.683,-19.431 -0.63,-19.431 -0.372,-19.173 -0.372,-18.201 -1.209,-17.364 -1.209,-15.877 -1.351,-15.735 -2.552,-15.735 -2.7,-15.883 -2.7,-18.967 -3.079,-19.345 -3.079,-19.363 -3.146,-19.43 -3.146,-21.941
  region net NetD4_K: -4.998,-15.737 -3.818,-15.737 -3.417,-16.139 -3.417,-18.983 -3.77,-19.337 -4.805,-19.337 -5.023,-19.118 -5.023,-15.762
  region net SGND: -11.749,-3.212 -10.294,-3.212 -10.071,-3.436 -10.071,-4.774 -10.34,-5.043 -11.553,-5.043 -11.932,-4.664 -11.932,-3.396
  region net SGND: -7.424,-6.395 -12.587,-6.395 -12.827,-6.636 -12.827,-7.821 -12.582,-8.067 -10.511,-8.067 -9.895,-8.683 -6.96,-8.683 -6.555,-8.278 -6.555,-7.265
  region net A: -6.051,-3.593 -5.241,-3.593 -5.103,-3.732 -5.103,-5.608 -5.395,-5.901 -5.985,-5.901 -6.139,-5.747 -6.139,-3.681
  region net OPTO: -6.994,-4.927 -6.831,-5.09 -6.831,-5.751 -7.032,-5.952 -9.973,-5.952 -10.067,-5.858 -10.067,-5.601 -9.393,-4.927
  region net NetBD1_1: -27.336,-37.084 -26.116,-37.084 -25.782,-37.418 -25.782,-39.15 -24.922,-40.009 -24.922,-41.077 -25.098,-41.253 -27.283,-41.253 -27.471,-41.066 -27.471,-37.218
  region net NetBD1_1: -37.171,-34.481 -35.342,-34.481 -35.157,-34.666 -35.157,-35.291 -35.363,-35.497 -37.181,-35.497
  region net NetN_1: -37.174,-37.099 -34.003,-37.099 -33.813,-37.288 -33.813,-40.773 -33.968,-40.928 -36.799,-40.928 -37.187,-40.54 -37.187,-37.113 -37.175,-37.101
  region net PGND: -7.176,-29.441 -5.529,-29.441 -5.362,-29.608 -5.362,-32.005 -5.677,-32.32 -7.248,-32.32 -7.392,-32.175 -7.392,-29.658
  region net PGND: -6.429,-17.974 -18.256,-17.974 -18.516,-18.235 -19.881,-18.235 -20.33,-17.785 -20.33,-16.642 -19.785,-16.097 -15.213,-16.097 -14.434,-16.876 -10.567,-16.876 -9.832,-16.141 -6.359,-16.141 -6.081,-16.419 -6.081,-17.627
  region net NetR15_1: -23.597,-25.962 -22.277,-25.962 -22.097,-26.142 -22.097,-28.694 -22.293,-28.89 -23.583,-28.89 -23.774,-28.698 -23.774,-26.138
  region net SGND: -31.249,-9.742 -29.313,-9.742 -28.882,-10.172 -28.199,-10.172 -27.65,-9.623 -27.65,-8.501 -28.302,-7.849 -31.174,-7.849 -31.412,-8.088 -31.412,-9.579
  region net NetRX3_2: -32.058,-37.069 -29.253,-37.069 -29.047,-37.275 -29.047,-40.792 -29.271,-41.015 -32.033,-41.015 -32.243,-40.805 -32.243,-37.255
  region net NewNet33: -26.62,-9.616 -26.62,-7.158 -26.17,-6.707 -25.716,-7.161 -25.716,-9.616
  region net SCL: -25.12,-9.616 -25.12,-7.158 -24.963,-7 -24.377,-7 -24.216,-7.161 -24.216,-9.616
  region net SDA: -23.62,-9.616 -23.62,-7.158 -23.463,-7 -22.877,-7 -22.716,-7.161 -22.716,-9.616
  region net SWCLK: -22.12,-9.616 -22.12,-7.158 -21.963,-7 -21.377,-7 -21.216,-7.161 -21.216,-9.616
  region net SCL: 2.409,-3.361 -0.003,-3.361 -0.45,-3.808 -0.45,-4.725 -0.404,-4.771 0.088,-4.771 0.489,-4.371 2.409,-4.371
  region net SDA: 2.388,-4.968 0.406,-4.968 0.118,-5.256 0.118,-6.222 0.205,-6.309 0.548,-5.965 2.388,-5.965
  region net SWCLK: 2.394,-6.57 0.588,-6.57 0.042,-7.116 0.042,-7.473 0.138,-7.569 2.394,-7.569
  region net SWDIO: 2.401,-9.165 0.445,-9.165 0.134,-8.854 0.134,-8.813 -0.182,-8.813 -0.326,-8.669 0.173,-8.17 2.401,-8.17
  region net SWDIO: -20.62,-9.616 -20.62,-7.158 -20.463,-7 -19.877,-7 -19.716,-7.161 -19.716,-9.616
  region net NewNet33: -9.332,-4.259 -9.068,-4.523 -6.968,-4.523 -6.837,-4.392 -6.837,-0.703 -7.273,-0.268 -8.57,-0.268 -8.73,-0.429 -9.76,-0.429 -9.832,-0.5 -9.332,-1
  region net ISET: -6.914,-24.404 -6.914,-26.488 -6.384,-27.018 -4.095,-27.018 -3.982,-26.905 -3.982,-26.248 -4.075,-26.155 -5.019,-26.155 -5.26,-25.914 -5.26,-24.648 -5.503,-24.404
  region net M: -7.572,-33.708 -7.572,-33.04 cw(c-7.383,-33.04) -7.383,-32.851 -5.794,-32.851 ccw(c-5.794,-32.189) -5.326,-32.657 -4.771,-32.103 cw(c-4.618,-32.256) -4.618,-32.039 -4.617,-32.039 cw(c-4.617,-32.302) -4.354,-32.302 -4.354,-32.31 cw(c-4.583,-32.31) -4.421,-32.472 -5.596,-33.646 cw(c-6.101,-33.141) -6.101,-33.855 -7.424,-33.855 cw(c-7.424,-33.708)
  region net NetC6_1: -23.229,-24.366 -22.429,-24.366 ccw(c-22.429,-23.825) -22.046,-24.207 -21.957,-24.118 cw(c-20.161,-25.914) -20.161,-23.374 -19.387,-23.374 ccw(c-19.387,-22.77) -18.783,-22.77 -18.783,-22.614 ccw(c-19.342,-22.614) -19.342,-22.055 -21.863,-22.055 ccw(c-21.863,-24.244) -23.411,-22.696 -23.503,-22.788 ccw(c-22.86,-23.431) -23.769,-23.431 -23.769,-24.061 ccw(c-23.464,-24.061) -23.464,-24.367
  region net PGND: -3.636,-41.188 -2.367,-41.188 ccw(c-2.367,-41.005) -2.183,-41.005 -2.183,-39.663 ccw(c-2.322,-39.663) -2.322,-39.524 -3.621,-39.524 ccw(c-3.621,-39.71) -3.806,-39.71 -3.806,-41.015 ccw(c-3.636,-41.015) -3.636,-41.185
  region net NetC6_1: -7.408,-41.144 -4.757,-41.144 ccw(c-4.757,-40.74) -4.353,-40.74 -4.353,-38.407 ccw(c-4.584,-38.407) -4.584,-38.176 -7.326,-38.176 ccw(c-7.326,-38.571) -7.721,-38.571 -7.721,-40.848 ccw(c-7.425,-40.848) -7.425,-41.144
  region net Bais-L: -7.377,-34.913 -4.76,-34.913 cw(c-4.76,-35.145) -4.528,-35.145 -4.528,-37.594 cw(c-4.749,-37.594) -4.749,-37.815 -7.168,-37.815 cw(c-7.168,-37.261) -7.722,-37.261 -7.722,-35.101 cw(c-7.534,-35.101) -7.534,-34.913
  region net NetC4_1: -3.75,-36.821 -3.146,-36.821 cw(c-3.146,-37.039) -2.929,-37.039 -2.929,-38.792 cw(c-3.219,-38.792) -3.219,-39.082 -3.782,-39.082 cw(c-3.782,-38.903) -3.961,-38.903 -3.961,-37.007 cw(c-3.775,-37.007) -3.775,-36.821
  region net NetC4_2: -3.471,-32.857 -2.694,-32.857 cw(c-2.694,-33.16) -2.391,-33.16 -2.391,-36.04 cw(c-2.624,-36.04) -2.624,-36.273 -3.367,-36.273 cw(c-3.367,-35.972) -3.668,-35.972 -3.668,-35.427 ccw(c-4.963,-35.427) -4.047,-34.511 cw(c-3.488,-33.952) -4.279,-33.952 -4.279,-33.16 cw(c-3.977,-33.16) -3.977,-32.857
  region net NetC2_2: -11.9,-34.199 -10.907,-34.199 cw(c-10.907,-35.763) -9.343,-35.763 -9.343,-37.083 cw(c-9.678,-37.083) -9.678,-37.418 -11.625,-37.418 cw(c-11.625,-37.13) -11.913,-37.13 -11.913,-36.405 ccw(c-13.069,-36.405) -12.251,-35.588 -12.498,-35.342 cw(c-12.336,-35.18) -12.564,-35.18 -12.564,-34.52 cw(c-12.243,-34.52) -12.243,-34.198
  region net NetC1_2: -13.859,-40.996 cw(c-13.859,-40.466) -14.388,-40.466 -14.388,-36.774 cw(c-14.076,-36.774) -14.297,-36.553 -13.979,-36.235 cw(c-13.684,-36.53) -13.684,-36.113 -13.177,-36.113 cw(c-13.177,-36.449) -12.84,-36.449 -12.84,-38.037 ccw(c-12.137,-38.037) -12.137,-38.74 -10.085,-38.74 cw(c-10.085,-39.418) -9.407,-39.418 -9.407,-40.599 cw(c-9.801,-40.599) -9.801,-40.994
  region net NetL2_1: -17.864,-30.221 -16.708,-30.221 ccw(c-16.708,-29.934) -16.421,-29.934 cw(c-15.48,-29.934) -15.48,-28.993 -15.382,-28.993 ccw(c-15.382,-28.676) -15.066,-28.676 -15.066,-25.69 ccw(c-15.521,-25.69) -15.521,-25.235 -16.422,-25.235 ccw(c-16.422,-25.598) -16.679,-25.341 -17.404,-26.066 ccw(c-15.608,-27.862) -18.148,-27.862 -18.148,-29.941 ccw(c-17.87,-29.941) -17.87,-30.219
  region net SW: -14.784,-29.734 -9.438,-29.734 cw(c-9.438,-30.233) -8.939,-30.233 -8.939,-31.478 cw(c-9.254,-31.478) -9.254,-31.792 -15.143,-31.792 ccw(c-15.143,-32.469) -15.621,-31.991 -16.665,-33.035 cw(c-16.757,-32.943) -16.757,-33.073 -17.94,-33.073 cw(c-17.94,-32.862) -18.151,-32.862 -18.151,-32.018 cw(c-17.878,-32.018) -17.878,-31.745 ccw(c-17.878,-29.35) -16.185,-31.044 -15.699,-30.558 ccw(c-16.109,-30.148) -15.529,-30.148 cw(c-15.114,-30.148) -15.114,-29.733 -14.799,-29.733
  region net NetBD1_3: -37.168,-29.596 -31.487,-29.596 ccw(c-31.487,-27.056) -29.691,-28.852 -28.871,-28.031 ccw(c-30.667,-26.235) -28.127,-26.235 -28.127,-23.297 cw(c-25.587,-23.297) -27.383,-21.501 -26.413,-20.531 cw(c-24.617,-22.327) -24.617,-19.787 -22.87,-19.787 ccw(c-22.87,-18.676) -21.759,-18.676 -21.759,-17.033 ccw(c-22.557,-17.033) -22.557,-16.236 -24.196,-16.236 ccw(c-24.196,-18.776) -25.992,-16.979 -29.055,-20.042 ccw(c-27.259,-21.838) -29.799,-21.838 -29.799,-22.115 cw(c-29.973,-22.115) -29.973,-22.288 cw(c-29.973,-22.102) -30.159,-22.102 -30.159,-20.981 cw(c-29.016,-20.981) -29.824,-20.172 -29.566,-19.914 ccw(c-30.314,-19.166) -29.256,-19.166 -29.256,-18.372 -29.381,-18.246 -31.083,-18.246 ccw(c-31.083,-18.68) -31.517,-18.68 -31.517,-22.524 ccw(c-30.846,-22.524) -30.846,-23.195 -30.19,-23.195 cw(c-30.19,-23.355) -30.03,-23.355 cw(c-30.185,-23.355) -30.185,-23.51 -31.079,-23.51 ccw(c-31.079,-23.92) -31.489,-23.92 -31.489,-26.708 cw(c-31.809,-26.708) -31.809,-27.028 -37.168,-27.028
Multi-Layer:
  pour cut-out: -3.745,-39.337 -3.329,-39.337 -3.083,-39.583 -3.083,-41.288 -3.213,-41.418 -3.819,-41.418 -4,-41.237 -4,-39.591
  pour cut-out: -4.522,-31.444 -4.522,-30.132 -3.934,-29.545 -2.65,-29.545 -1.993,-30.202 -1.993,-31.443 -2.636,-32.086 -3.879,-32.086